# Altium PCB TYH-PD67W 2C1A 主板0722.pcbdoc (part 1 of 2)
Units mm, origin at the board's own origin, x right, y up, seen from the top; angles counter-clockwise.
Board outline 42.31 x 42.1 mm, 5 copper layers (Top Layer, Signal Layer 3, Signal Layer 1, Signal Layer 2, Bottom Layer), stack 0.941 mm thick; 52 components, 178 nets, 147 pads, 295 vias.
Unrouted connection lines stored in the file: 1.
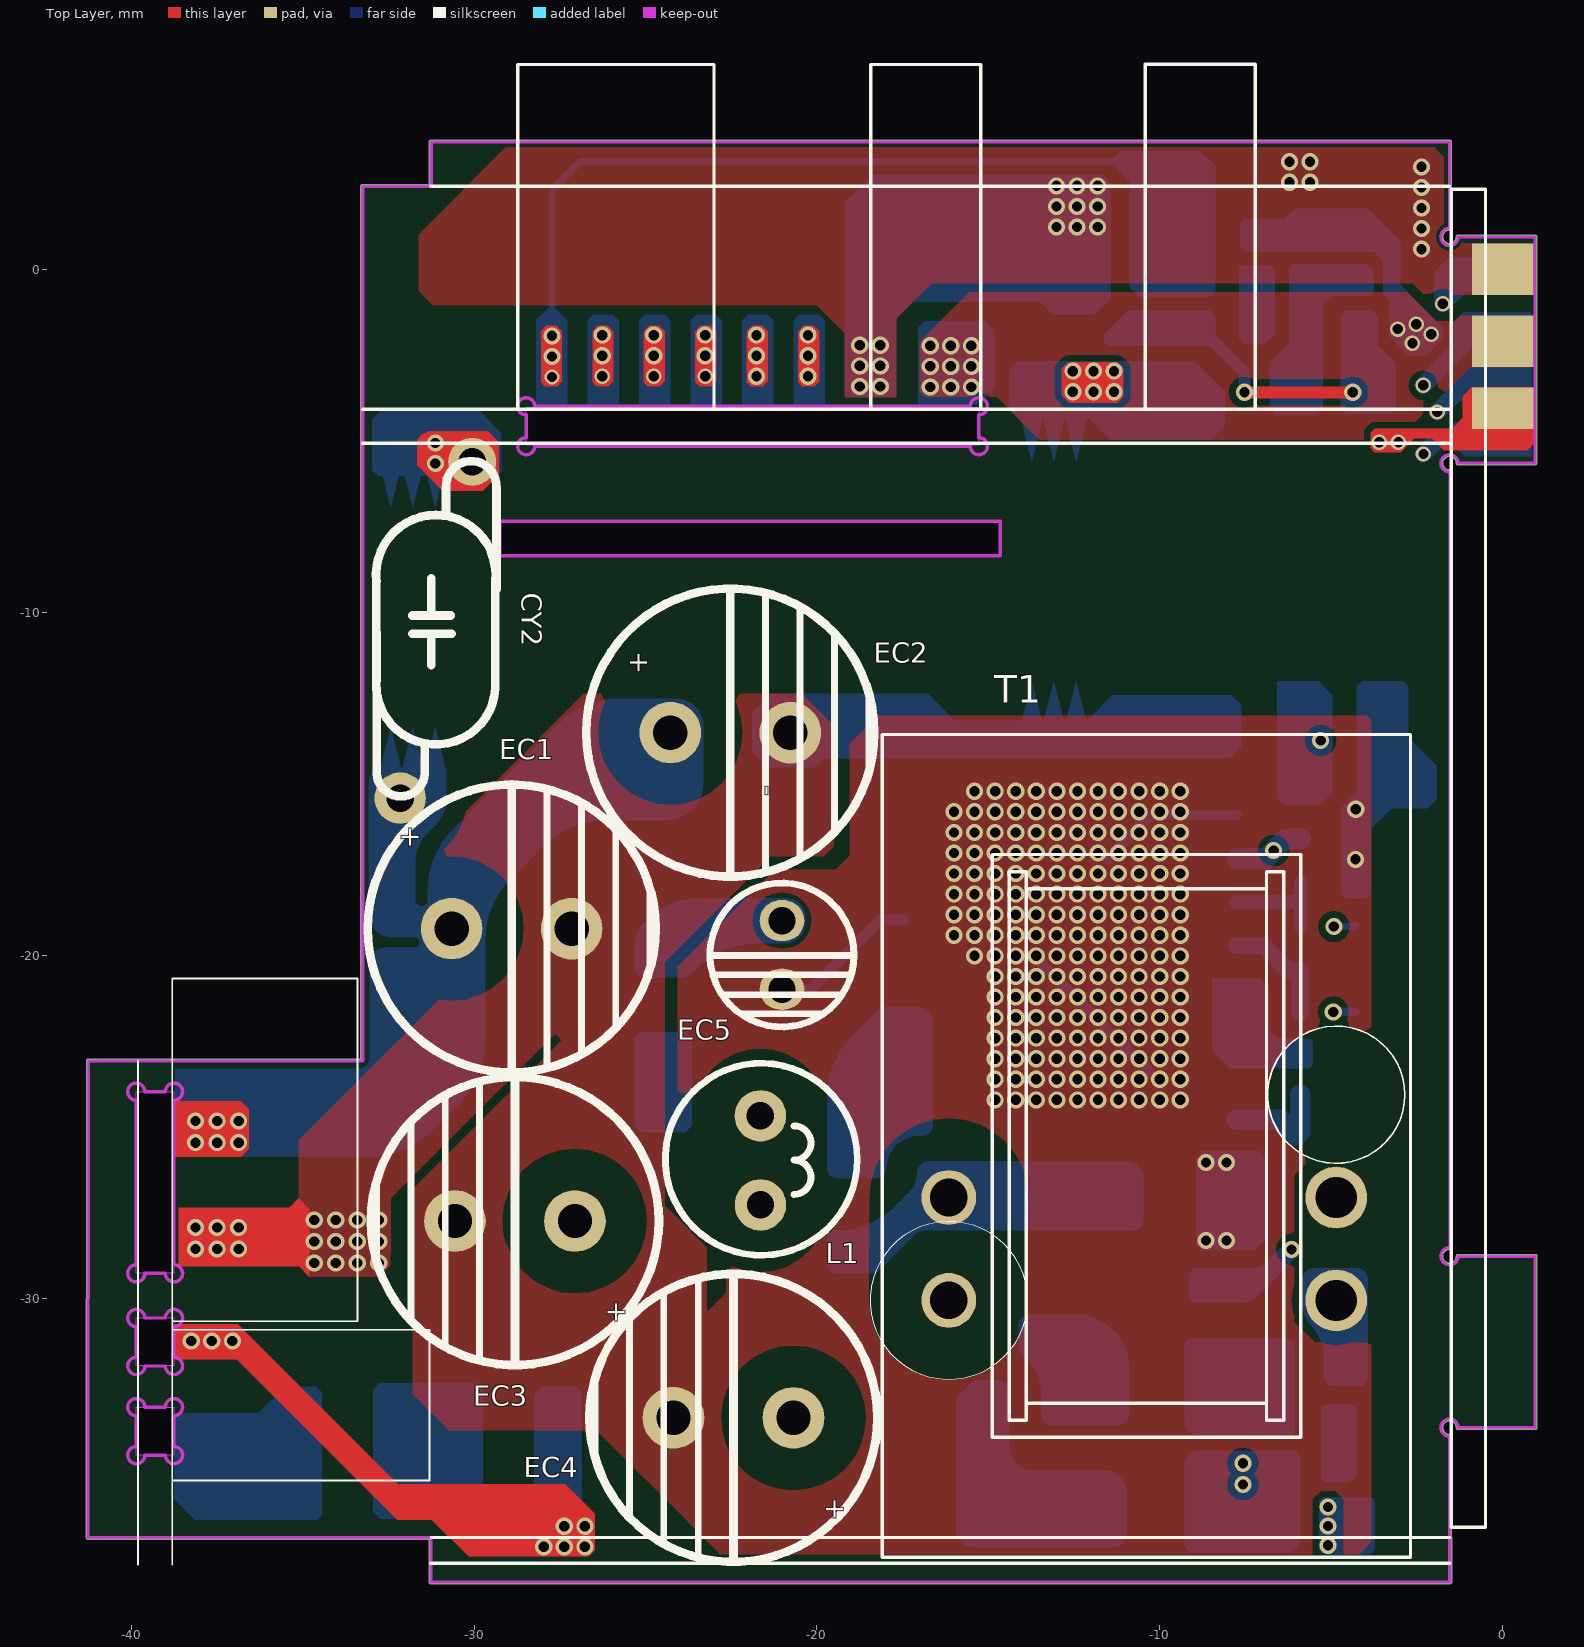
[diagram p0: Top Layer view]
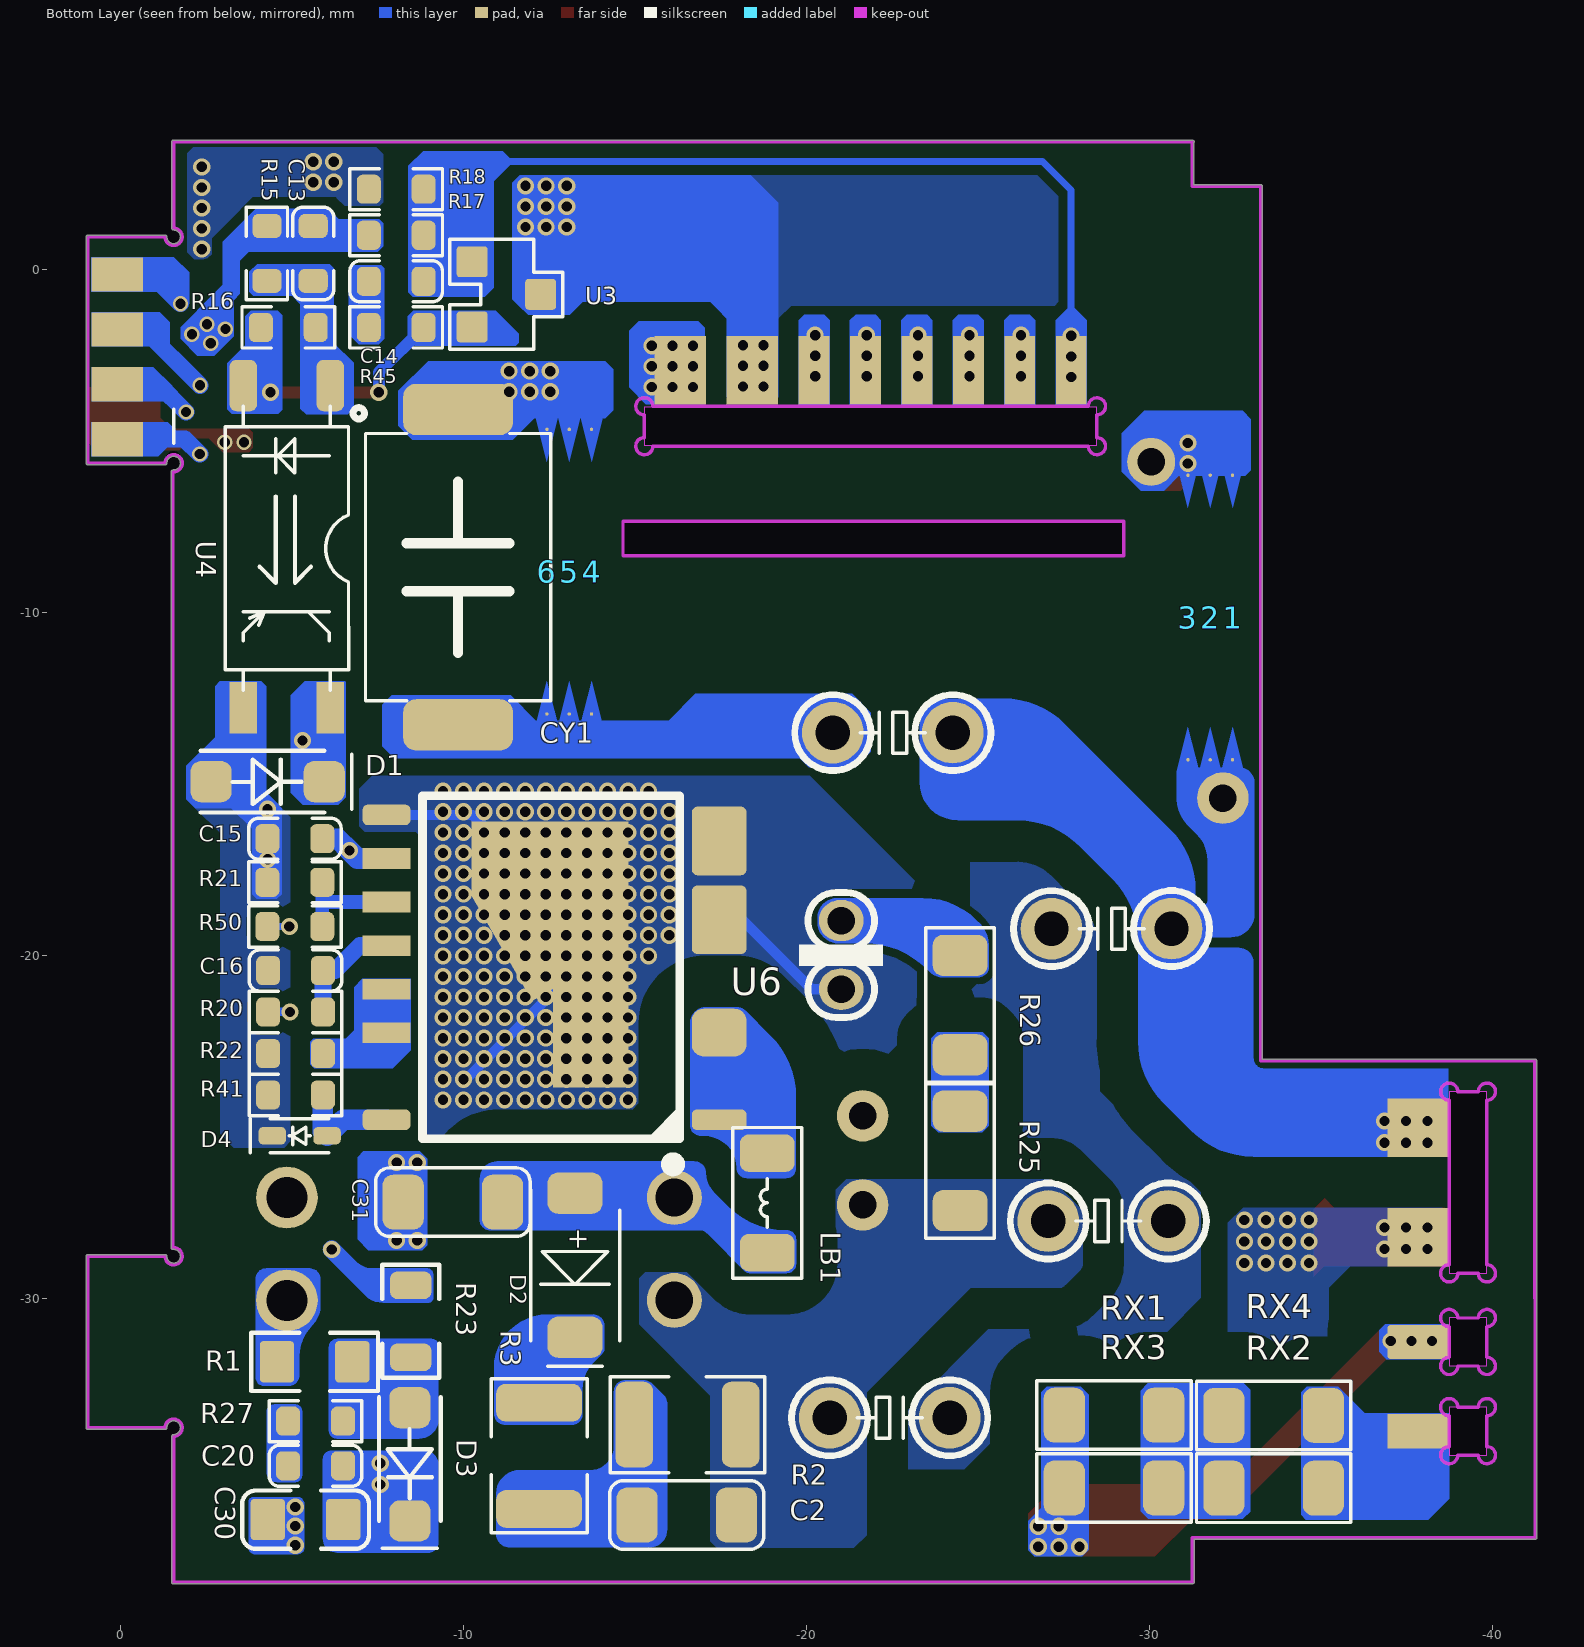
[diagram p1: Bottom Layer view, seen from below]
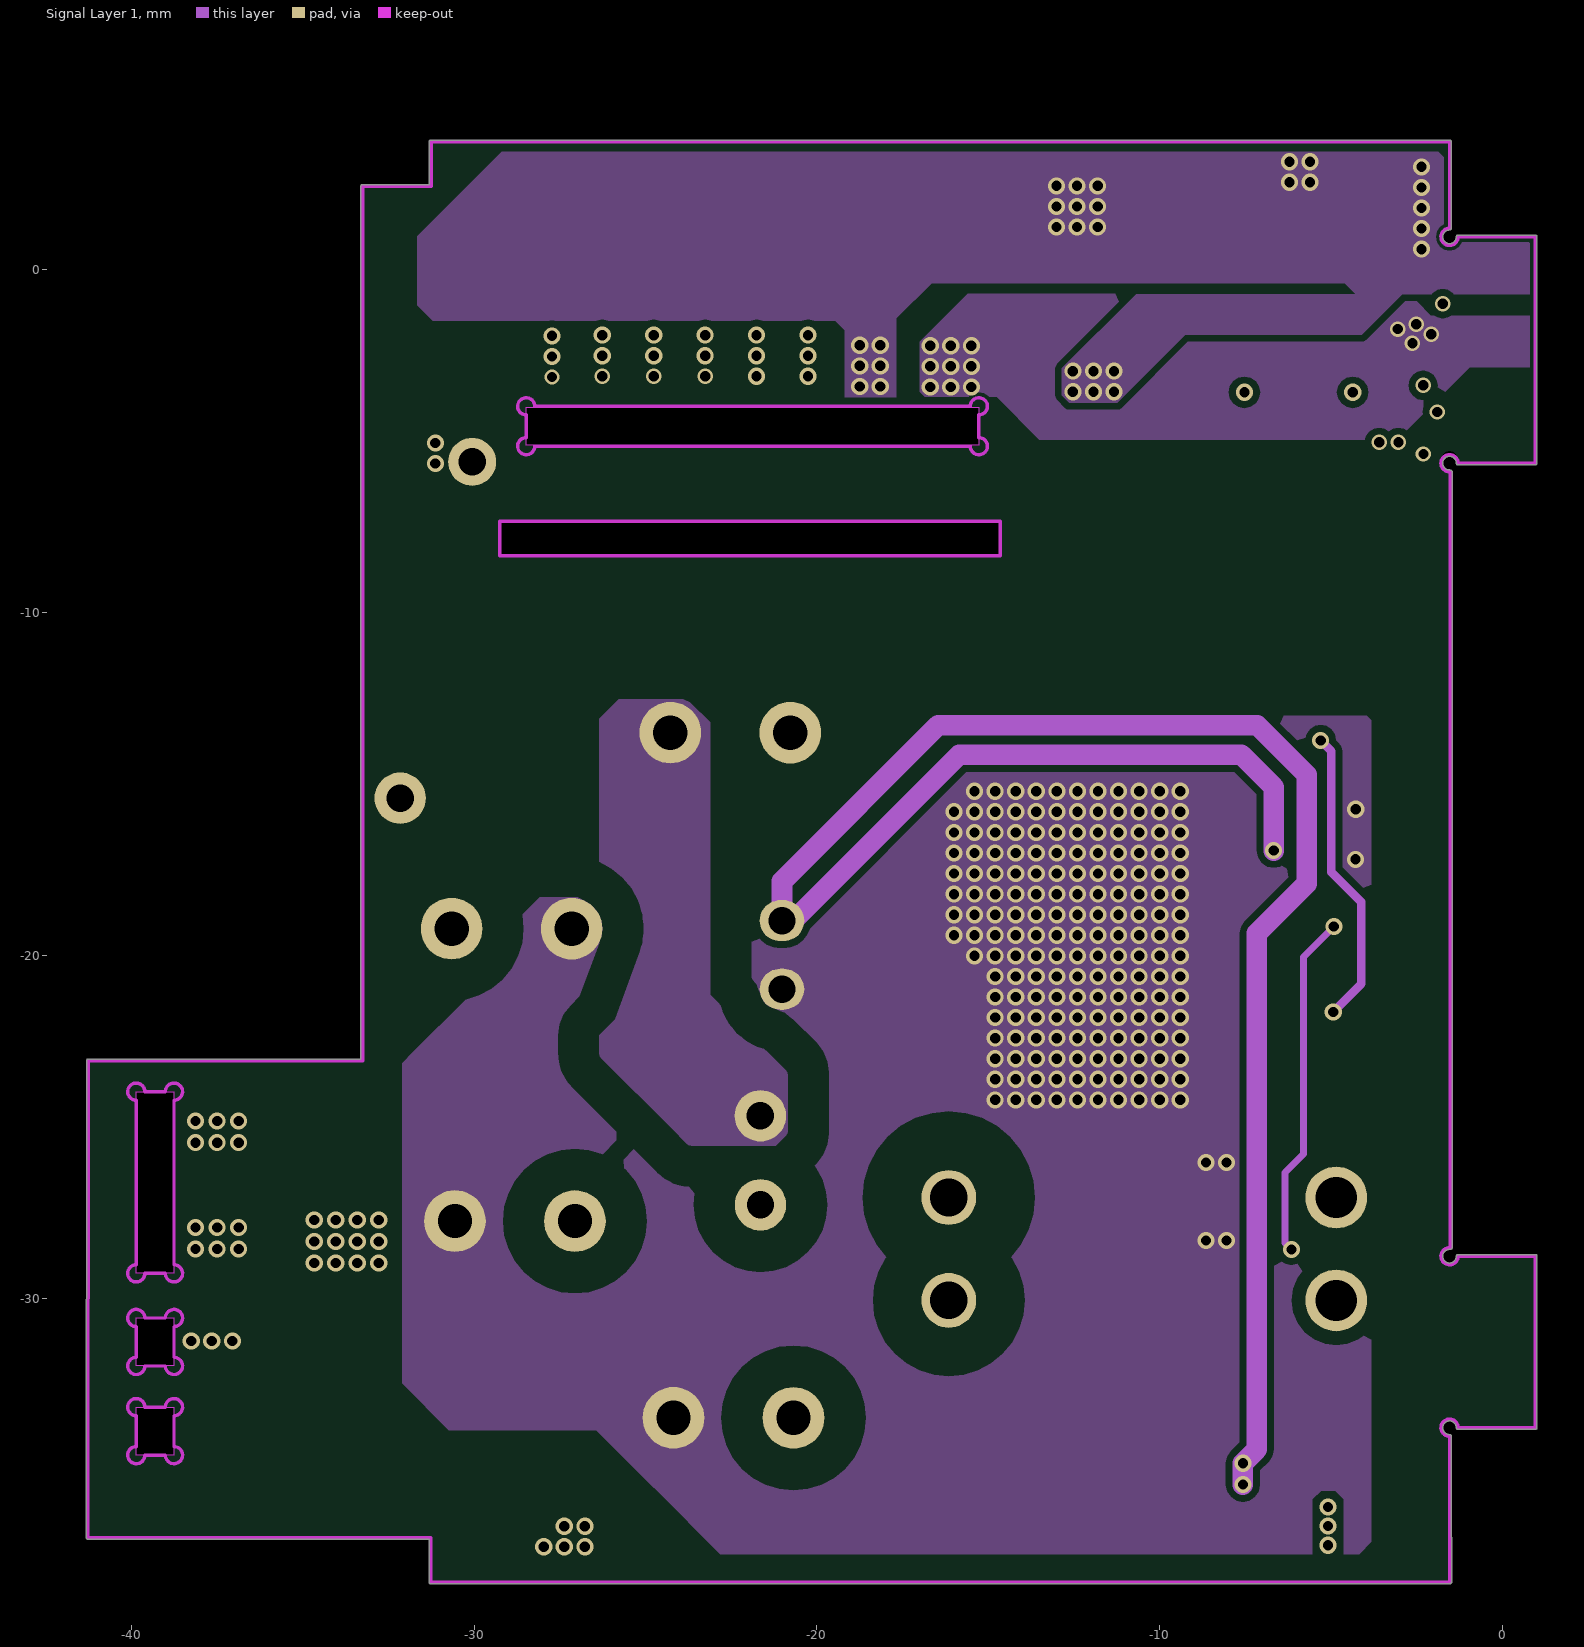
[diagram p2: Signal Layer 1]
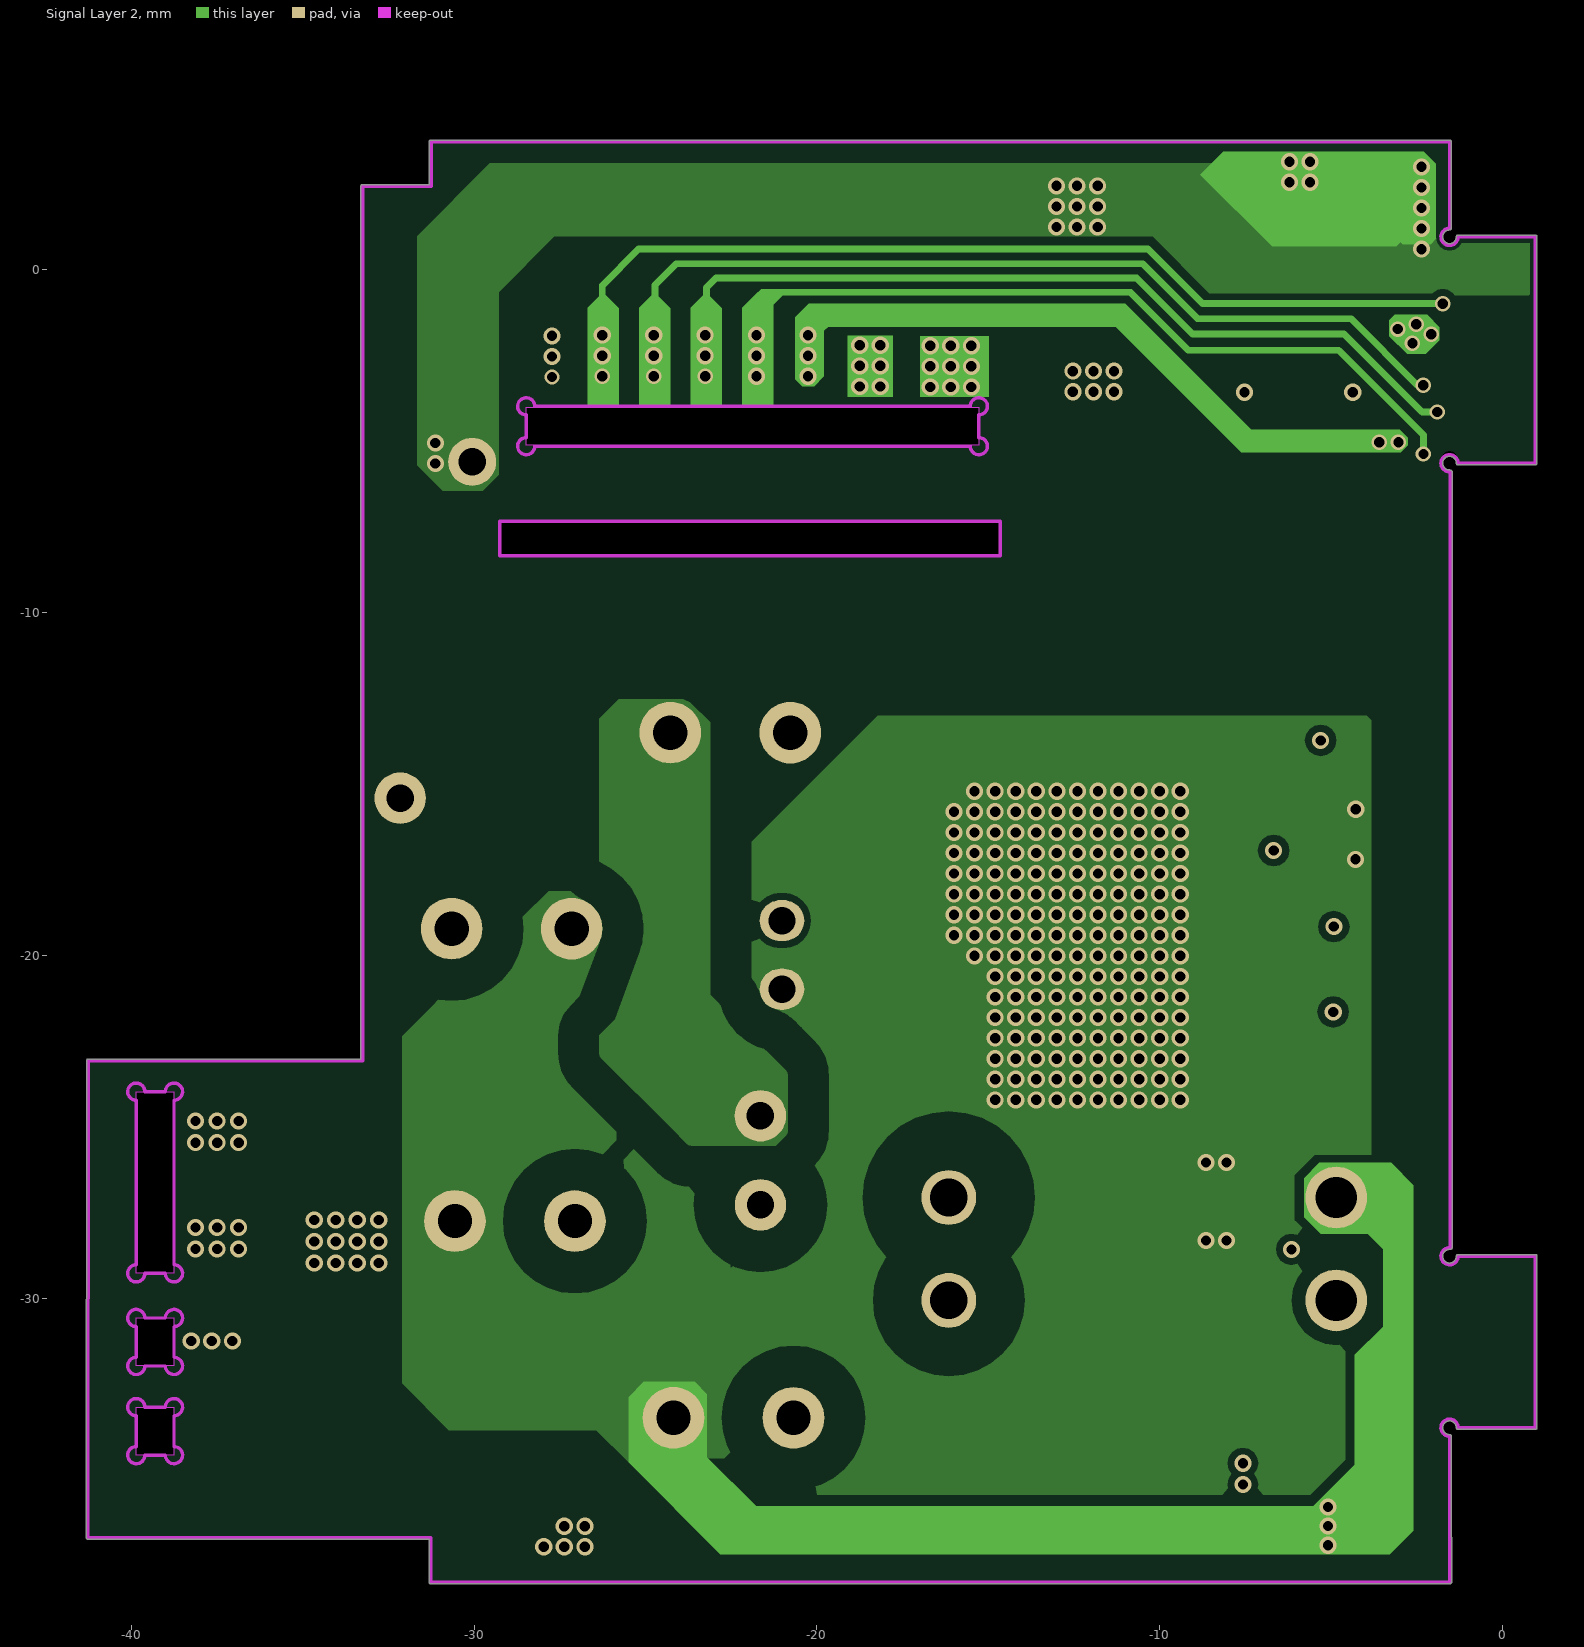
[diagram p3: Signal Layer 2]

## Layer stack, top to bottom
Top Solder: solder mask 0.0102, Solder Resist, Dk 3.5
Top Layer: signal copper 0.0356
Dielectric 1: core 0.254, FR-4, Dk 4.2
Signal Layer 3: signal copper 0.036
Dielectric 4: prepreg 0.127, Dk 4.2
Signal Layer 1: signal copper 0.036
Dielectric 2: core 0.254, Dk 4.2
Signal Layer 2: signal copper 0.036
Dielectric 3: prepreg 0.127, Dk 4.2
Bottom Layer: signal copper 0.0356
Bottom Solder: solder mask 0.0102, Solder Resist, Dk 3.5

## Board outline
-41.259,-37.031 -31.309,-37.033 -31.31,-38.283 ccw(c-31.26,-38.283) -31.26,-38.333 -1.55,-38.333 -1.54,-38.333 ccw(c-1.54,-38.283) -1.49,-38.283 ccw(c-1.54,-38.283) -1.49,-38.283 -1.491,-36.983 ccw(c-1.541,-36.983) -1.5,-36.954 -1.5,-34.031 ccw(c-1.55,-34.031) -1.55,-33.98 cw(c-1.55,-33.781) -1.35,-33.781 ccw(c-1.3,-33.781) -1.3,-33.831 0.95,-33.831 ccw(c0.95,-33.781) 1,-33.781 1,-28.781 ccw(c0.95,-28.781) 0.95,-28.73 -1.3,-28.73 ccw(c-1.3,-28.781) -1.35,-28.781 cw(c-1.55,-28.781) -1.55,-28.581 ccw(c-1.55,-28.531) -1.538,-28.579 ccw(c-1.526,-28.531) -1.475,-28.531 -1.475,-5.906 ccw(c-1.526,-5.906) -1.526,-5.856 ccw(c-1.55,-5.9) -1.55,-5.85 cw(c-1.55,-5.65) -1.35,-5.65 ccw(c-1.3,-5.65) -1.3,-5.7 0.95,-5.7 ccw(c0.95,-5.65) 1,-5.65 1,0.95 ccw(c0.95,0.95) 0.95,1 -1.3,1 ccw(c-1.3,0.95) -1.35,0.95 cw(c-1.55,0.95) -1.55,1.15 ccw(c-1.55,1.2) -1.5,1.2 -1.5,3.719 cw(c-1.55,3.719) -1.5,3.719 ccw(c-1.55,3.719) -1.55,3.77 ccw(c-1.55,3.719) -1.551,3.77 -31.25,3.77 cw(c-31.25,3.719) -31.249,3.77 -1.55,3.77 -31.26,3.77 ccw(c-31.26,3.719) -31.3,3.69 -31.3,2.47 -33.25,2.47 ccw(c-33.25,2.419) -33.3,2.419 -33.3,-23.03 -41.25,-23.03 ccw(c-41.25,-23.081) -41.3,-23.081 -41.31,-36.98 ccw(c-41.259,-36.98)
cut-out: -39.85,-33.181 -38.75,-33.181 -38.75,-34.581 -39.85,-34.581
cut-out: -39.85,-30.581 -38.75,-30.581 -38.75,-31.981 -39.85,-31.981
cut-out: -39.85,-23.981 -38.75,-23.981 -38.75,-29.281 -39.85,-29.281
cut-out: -14.654,-7.346 -29.254,-7.346 -29.254,-8.346 -14.654,-8.346
cut-out: -28.477,-4.024 -15.277,-4.024 -15.277,-5.124 -28.477,-5.124

## Design rules (kind name [scope] priority, off if disabled: settings)
Clearance Clearance_22 [InNet('HV') vs InNet('SW')] p1: gap=1.2
Clearance Clearance_21 [InNet('NetRX3_2') vs InNet('PGND')] p2: gap=1.5
Clearance Clearance_20 [InNet('NetBD1_1') vs InNet('PGND')] p3: gap=1.5
Clearance Clearance_19 [InNet('NetC4_2') vs InNet('PGND')] p4: gap=0.4
Clearance Clearance_18 [InNet('NetR15_1') vs InNet('PGND')] p5: gap=1
Clearance Clearance_17 [InNet('NetN_1') vs InNet('NetBD1_1')] p6: gap=1.55
Clearance Clearance_16 [InNet('NetN_1') vs InNet('PGND')] p7: gap=1.5
Clearance Clearance_15 [InNet('VIN') vs InNet('PGND')] p8 off: gap=5.8
Clearance Clearance_14 [InNet('CS') vs InNet('Bais-L')] p9: gap=0.45
Clearance Clearance_13 [InNet('SW') vs InNet('CS')] p10: gap=1.5
Clearance Clearance_12 [InNet('NetR15_1') vs InNet('CS')] p11: gap=1
Clearance Clearance_11 [InNet('NetBD1_3') vs InNet('CS')] p12: gap=1.1
Clearance Clearance_10 [InNet('HV') vs InNet('CS')] p13: gap=1.1
Clearance Clearance_9 [InNet('NetL2_1') vs InNet('CS')] p14: gap=1.5
Clearance Clearance_8 [InNet('NetC1_2') vs InNet('PGND')] p15: gap=1.2
Clearance Clearance_7 [InNet('NetBD1_3') vs InNet('PGND')] p16: gap=1.2
Clearance Clearance_6 [InNet('NetC2_2') vs InNet('PGND')] p17: gap=1.3
Clearance Clearance_5 [InNet('Bais-L') vs InNet('PGND')] p18: gap=0.45
Clearance Clearance_4 [InNet('SW') vs InNet('PGND')] p19: gap=1.5
Clearance Clearance_3 [InNet('HV') vs InNet('PGND')] p20: gap=1.2
Clearance Clearance_2 [InNet('NetL2_1') vs InNet('PGND')] p21: gap=1.5
Clearance Clearance_1 [OnLayer('Keep-Out Layer')] p22: gap=0.1
Clearance [All] p23: gap=0.2
PlaneConnect [All] p1: planeconnectstyle=Direct reliefexpansion=0.508 reliefentries=4 reliefconductorwidth=0.3 reliefairgap=0.254
PolygonConnect [All] p1: connectstyle=Direct reliefconductorwidth=0.3 reliefentries=4 polygonreliefangle="90 Angle" airgapwidth=0.3
RoutingVias [All] p1: holewidth=0.711 width=1.27 viastyle="Through Hole" minholewidth=0.711 minwidth=1.27 maxholewidth=0.711 maxwidth=1.27
SolderMaskExpansion [All] p1: expansion=0.05
Width [All] p1: maxlimit=10 minlimit=0.1 preferedwidth=0.2
28 further rules are at their usual default settings.

## Components (designator, comment, footprint, x,y, rotation, side; value= is the part's Value field where it differs from the comment)
1 "Comment" PET -32.431,-14.302 r180 top
2 "Comment" PET -31.781,-14.302 r180 top
3 "Comment" PET -31.131,-14.302 r180 top
4 "Comment" PET -13.737,-12.966 r180 top
5 "Comment" PET -13.087,-12.966 r180 top
6 "Comment" PET -12.437,-12.966 r180 top
C2 "1nF/1KV/1206" 1206CA -17.965,-36.325 r0 bottom (schematic designator C1)
C13 "33nF/25V/0402" 0603CX#1 -5.62,0.465 r90 bottom (schematic designator C21)
C14 "0.1uF" 0603CX#2 -8.839,-0.349 r0 bottom
C15 "2.2uF/25V/0603" 0603CX#2 -5.885,-16.602 r0 bottom (schematic designator C7)
C16 "470pF/25V/0402" 0603CX#1 -5.104,-20.448 r0 bottom (schematic designator C5)
C20 "220PF/250V/0805" 0603CX#2 -4.889,-34.894 r180 bottom (schematic designator C4)
C30 "1nF/1KV/1206" 0805C -7.247,-37.311 r0 bottom (schematic designator C1)
C31 "47PF/1KV/1206" 1206CA -11.145,-27.203 r0 bottom (schematic designator C2)
CY1 "470pF/400V" Y1-SMT -9.844,-8.685 r270 bottom (schematic designator CY2)
CY2 "470pF/400V" Y1-N -32.151,-15.419 r270 top
D1 "ER07J/SOD-123" SOD-123A -5.942,-14.941 r0 bottom (schematic designator D3)
D2 "S2M" SMAF -13.257,-29.042 r270 bottom (schematic designator D1)
D3 "ER07J/SOD-123" SOD-123A -8.439,-36.498 r90 bottom
D4 "ER07J/SOD-123" SOD-523 -6.024,-25.266 r0 bottom (schematic designator D3)
EC1 "33uF/400V/10*20max" EC-8*18L -28.904,-19.225 r90 top (schematic designator EC3)
EC2 "33uF/400V/10*20max" EC-8*18L -22.525,-13.51 r90 top (schematic designator EC1)
EC3 "33uF/400V/10*20max" EC-8*18L -28.806,-27.755 r270 top
EC4 "33uF/400V/10*20max" EC-8*18L -22.431,-33.494 r270 top (schematic designator EC3)
EC5 "4.7uF/100V/5*11" EC-4*7L -21.018,-18.993 r0 top (schematic designator C6)
L1 "LGB0510  80uH" L-5*11 -21.645,-24.885 r270 top
LB1 "600R@100MHZ" 1206L -18.862,-25.775 r270 bottom (schematic designator L2)
R1 "2.2R/0805" 0805R -4.496,-31.858 r180 bottom (schematic designator R13)
R2 "300K/1206" 1210RS -18.085,-33.689 r0 bottom (schematic designator R1)
R3 "10R/0805" 1210RS -12.207,-36.15 r90 bottom (schematic designator R4)
R15 "1K/0402" 0603RX#1 -4.269,0.465 r270 bottom (schematic designator R22)
R16 "1M/0402" 0603RX#1 -4.893,-1.693 r0 bottom (schematic designator R21)
R17 "100K" 0603RX#1 -8.04,0.996 r180 bottom
R18 "95.3K" 0603RX#1 -8.04,2.341 r180 bottom
R20 "51R/0402" 0603RX#1 -5.104,-21.655 r0 bottom (schematic designator R9)
R21 "18K/0402" 0603RX#1 -5.085,-17.876 r0 bottom (schematic designator R14)
R22 "220K/0805" 0603RX#2 -4.304,-22.869 r180 bottom (schematic designator R7)
R23 "220K/0805" 0805RX -8.465,-29.628 r270 bottom (schematic designator R7)
R25 "10K/1206" 1206RA -23.486,-28.201 r90 bottom (schematic designator R15)
R26 "10K/1206" 1206RA -23.486,-23.655 r90 bottom (schematic designator R15)
R27 "10R/0805" 0603RX#2 -6.488,-33.589 r0 bottom (schematic designator R10)
R41 "51R/0402" 0603RX#1 -5.104,-24.077 r180 bottom (schematic designator R9)
R45 "95.3K" 0603RX#1 -8.04,-1.693 r180 bottom
R50 "18K/0402" 0603RX#1 -5.085,-19.166 r0 bottom (schematic designator R14)
RX1 "2M 1206" 1206RA -31.174,-34.415 r0 bottom
RX2 "2M 1206" 1206RA -35.83,-36.545 r0 bottom
RX3 "2M 1206" 1206RA -31.174,-36.539 r0 bottom
RX4 "2M 1206" 1206RA -35.83,-34.42 r0 bottom
T1 "Comment" "ATQ2315P 4+4" -16.153,-21.068 r0 top
U3 "2N7002KL SOT-23" SOT-23_R -11.254,-0.727 r270 bottom (schematic designator Q8)
U4 "LTV-217-B" CT1018 -6.521,-2.637 r270 bottom
U6 "Comment" MK2789IAM/ESOP10(分) -16.31,-15.355 r180 bottom

## Footprints (in the part's own frame and the unit in brackets; to place one, negate y for a bottom-side part, rotate by r counter-clockwise, add the part's x,y. Pads: shape width x height; smd on the part's side, far side on the other; paste and mask are expansions set on the pad)
0603CX#1 [mm]
  rrect50% 0.7x0.85 smd: 1(-0.8,0) 2(0.8,0)
  silkscreen extent -1.35,-0.6 1.35,0.6, body extent -0.8,-0.41 0.8,0.41, height 0.81
0603CX#2 [mm]
  rrect50% 0.7x0.85 smd: 1(0,0) 2(1.6,0)
  silkscreen extent -0.55,-0.6 2.15,0.6, body extent 0,-0.41 1.6,0.41, height 0.81
0603RX#1 [mm]
  rrect50% 0.7x0.85 smd: 1(-0.8,0) 2(0.8,0)
  silkscreen extent -1.35,-0.6 1.35,0.6, body extent -0.77,-0.42 0.78,0.43, height 0.45
0603RX#2 [mm]
  rrect50% 0.7x0.85 smd: 1(0,0) 2(1.6,0)
  silkscreen extent -0.55,-0.6 2.15,0.6, body extent 0.03,-0.42 1.58,0.43, height 0.45
0805C [mm]
  rrect20% 1x1.2 smd: 1(0.75,-0.85) 2(2.95,-0.85)
  silkscreen extent 0,-1.7 3.7,0, body extent 0.85,-1.46 2.85,-0.24, height 0.51
0805R [mm]
  rrect20% 1x1.2 smd: 1(0.066,-0.001) 2(2.266,-0.001)
  silkscreen extent -0.68,-0.85 3.02,0.85, body extent 0.17,-0.63 2.17,0.62, height 0.45
0805RX [mm]
  rrect50% 0.8x1.2 smd: 1(0,0) 2(2.1,0)
  silkscreen extent -0.6,-0.83 2.7,0.83, body extent 0.05,-0.61 2.05,0.61, height 0.51
1206CA [mm]
  rrect50% 1.2x1.6 smd mask+0.03: 1(0,0) 2(2.9,0)
  silkscreen extent -0.8,-1 3.7,1, body extent -0.15,-0.81 3.05,0.81, height 1.21
1206L [mm]
  rrect50% 1.1x1.6 smd mask+0.03: 1(0,0) 2(2.9,0)
  silkscreen extent -0.75,-1 3.65,1, body extent -0.15,-0.8 3.05,0.8, height 1
1206RA [mm]
  rrect50% 1.2x1.6 smd mask+0.03: 1(3.65,-1) 2(0.75,-1)
  silkscreen extent -0.05,-2 4.45,0, body extent 0.6,-1.8 3.8,-0.2, height 0.55
1210RS [mm]
  rrect50% 1.1x2.5 smd mask+0.03: 1(3.1,0) 2(0,0)
  silkscreen extent -0.7,-1.4 3.8,1.4, body extent -0.05,-1.25 3.15,1.25, height 0.55
"ATQ2315P 4+4" [mm]
  round 1 on Top Overlay mask+0.04: 1(0,0) 2(0,-3) 7(11.3,-3) 8(11.3,0)
  round 1.6 hole 1.1 mask+0.04: 3(0,-6) 4(0,-9)
  round 1.8 hole 1.2 mask+0.04: 5(11.3,-9) 6(11.3,-6)
  silkscreen extent -1.94,-16.5 13.46,7.5, body extent -1.79,-16.02 13.31,7.08, height 19.06
CT1018 [mm]
  rrect50% 1.5x0.8 smd: 1(0.75,-0.4) 2(0.75,-2.94)
  rect 1.5x0.8 smd: 3(10.15,-2.941) 4(10.15,-0.4)
  silkscreen extent 1.36,-3.47 9.64,0.59, body extent 0.38,-3.47 10.58,0.13, height 2.3
EC-4*7L [mm]
  oval 1.3x1.2 hole 0.8: 1(0,0) 2(0,-2)
  silkscreen extent -2.1,-3.1 2.1,1.1, body extent -2.01,-3.04 1.99,0.98, height 8.04
EC-8*18L [mm]
  round 1.8 hole 1: 1(0,1.749) 2(-0.002,-1.751)
  silkscreen extent -4.2,-4.2 4.2,4.2, body extent -4,-4 4,4, height 18
L-5*11 [mm]
  round 1.5 hole 0.8: 1(-0.2,0) 2(2.4,0)
  silkscreen extent -1.73,-2.77 3.87,2.82, body extent -1.56,-2.61 3.71,2.64, height 11.5
MK2789IAM/ESOP10(分) [mm]
  rrect50% 1.6x0.6 smd: 1(1.15,-9.445)
  rrect50% 1.6x1.4 smd: 2(1.15,-6.905)
  rrect20% 1.6x2 smd: 3(1.15,-3.615) 4(1.15,-1.315)
  rrect50% 1.4x0.6 smd: 5(-8.55,-0.555) 11(-8.55,-9.445)
  rect 1.4x0.6 smd: 7(-8.55,-3.095) 8(-8.55,-4.365) 9(-8.55,-5.635) 10(-8.55,-6.905) EM(-8.55,-1.825)
  rect 2.6x2.165 smd: 12(-4.775,-1.833)
  rect 3.55x2.6 smd rot 120: 12(-4.062,-3.802)
  rect 2.2x7.755 smd: 12(-2.6,-4.627)
  silkscreen extent -7.5,-10.89 0.05,0, body extent -8.91,-10 1.41,0, height 1.85
PET [mm]
  round 0.1 smd far side: 1(0,0) 2(0,-8.3)
  Bottom Layer region: 0.35,-8.75 -0.35,-8.75 0,-7.35
  Bottom Layer region: 0.325,0.35 -0.325,0.35 0,-0.95
SMAF [mm]
  rrect50% 1.2x1.6 smd: 1(-2.1,0) 2(2.1,0)
  silkscreen extent -2.2,-1.3 2.95,1.3, body extent -2.35,-1.25 2.35,1.25, height 1
SOD-123A [mm]
  rrect50% 1.2x1.2 smd: 1(3.3,0) 2(0,0)
  silkscreen extent -0.8,-0.9 3.6,0.9, body extent -0.19,-0.8 3.51,0.8, height 1.22
SOD-523 [mm]
  rrect50% 0.8x0.5 smd: 1(0,0) 2(1.6,0)
  silkscreen extent -0.05,-0.5 2.24,0.5, body extent 0,-0.4 1.6,0.4, height 0.65
SOT-23_R [mm]
  rrect20% 0.9x0.9 smd: 1(-0.95,-1) 2(0.95,-1) 3(0,1)
  silkscreen extent -1.6,-1.65 1.6,1.65, body extent -1.46,-1.44 1.44,1.36, height 1.2
Y1-N [mm]
  round 1.5 hole 0.8: 1(0,0)
  round 1.4 hole 0.8: 2(-9.806,2.096)
  silkscreen extent -9.83,-0.7 -0.05,2.8, body extent -10.14,-1.57 0.34,3.66, height 8.2
Y1-SMT [mm]
  rrect50% 1.5x3.2 smd: 1(-4.6,0) 2(4.6,0)
  silkscreen extent -3.9,-2.7 3.9,2.7, body extent -5,-2.7 5,2.7, height 2.5

## Part data
C2 C15 C16 C20 C30 C31: library part CAP
C13: library part Cap, "Capacitor"
CY1 CY2: library part Cap
D1 D3 D4: library part DIODE
D2: library part Diode_fast, "High Conductance Fast Diode"
EC1 EC2 EC3 EC4 EC5: library part CAPACITOR, "C?"
L1: library part L-1
LB1 R1 R2 R3 R15 R16 R20 R21 R22 R23 R25 R26 R27 R41 R50 RX1 RX2 RX3 RX4: library part Res1, "Resistor"
U3: library part NMOS
U4: library part PC817, "Optocoupler，PC817X2YIPW，4pin SOP"

## Free pads (board coordinates)
  rect 1.8x1 smd far side: 0(-37.85,-33.881)
  rrect20% 1.8x1 smd far side: 0(-37.85,-31.281)
  rect 1.8x1.7 smd far side: 0(-37.85,-28.231) 0(-37.85,-25.031)
  rect 1.5x2 smd far side: 0(-18.427,-2.943) 1(-16.327,-2.943)
  round 0.2 hole 0.5: 0(-1.55,-5.55) 2(-1.55,-28.781) 3(-1.55,-33.781)
  rect 0.9x2 smd far side: 2(-27.727,-2.943) 2(-26.227,-2.943) 2(-24.727,-2.943) 2(-23.227,-2.943) 2(-21.727,-2.943) 2(-20.227,-2.943)
  rect 1.8x1.2 smd: 3(0,-4.05)
  rect 1.8x1.5 smd: 3(0,-2.1) 3(0,0)
  rect 1.5x1 smd far side: 3(0.1,-4.95) 3(0.1,-3.35) 3(0.1,-1.75) 3(0.1,-0.15)

## Via types
v1: diameter 0.5, hole 0.3, Top Layer to Bottom Layer, tented both sides, 281 vias
v2: diameter 0.45, hole 0.3, Top Layer to Bottom Layer, tented both sides, 14 vias

## Nets (pads, with @x,y where several pads share a name; then routed paths per layer and width w, separated by ;. In a path a pad name is that pad's centre, name@x,y a point inside that pad or via, vN(x,y) a via of type N, cw(c..) or ccw(c..) an arc to the next point about the centre after c; other vN are vias at no path point)
3.3V: 
A: C14.2 R45.1
A+: 
A-: 
BACK_LED: 
Bais-L: D3.1 R1.2 R23.2 R27.1
BOOT0: 
BUTTON: 
CC1: 
CC2: 
CPA: 
CS: 
D: 
D25_INT: 
D31_EN1: 
D31_EN2: 
D31_INT1: 
D+: 
D-: 
DM: 
DP: 
EM: D4.1 R41.2 U6.11 | length 3.2
  Bottom Layer w0.6: U6.11@-7.76,-24.8 -6.491,-24.8 D4.1@-6.024,-25.266 -5.904,-25.147 R41.2@-5.904,-24.077
EN: 
EN_IC: 
FB: C16.1 R20.1 U6.8 | length 3.4
  Bottom Layer w0.5: U6.8@-7.76,-19.72 -6.981,-19.72 -6.253,-20.447 C16.1@-5.904,-20.447 R20.1@-5.904,-21.655
FLASH_CLK: 
FLASH_CS: 
FLASH_MISO: 
FLASH_MOSI: 
G-SR: 
GND-C: 
HV: C2.1 EC3.1 EC4.1 L1.2 R2.2 R25.2 T1.4
ISET: R22.2 U6.9 U6.10 | length 3.4
  Bottom Layer w0.5: U6.9@-7.76,-20.99 U6.10@-7.76,-22.26 -7.151,-22.869 R22.2@-5.904,-22.869
KEY: 
KEY1: 
LCD_CS: 
LCD_DC: 
LCD_EN2: 
LCD_MOSI: 
LCD_RES: 
LCD_TE: 
LEDA: 
M: R23.1 R50.2 | length 13.4
  Signal Layer 1 w0.2: v1(-6.161,-28.581) -6.352,-28.39 -6.352,-26.343 -5.808,-25.799 -5.808,-20.05 v1(-4.923,-19.166)
  Bottom Layer w0.2: R23.1@-8.465,-29.628 -7.209,-29.628 v1(-6.161,-28.581) ; v1@-4.909,-19.166 R50.2@-4.285,-19.166
N: 
NetBD1_1: pad.0@-37.85,-31.281 RX1.1 RX3.1
  other v1: -27.966,-37.254 -27.366,-37.254 -26.766,-37.254 -27.366,-36.654 -26.766,-36.654 -38.248,-31.254 -37.648,-31.254 -37.048,-31.254
NetBD1_3: 1.1 2.1 3.1 CY2.1 EC1.1 EC2.1 L1.1 pad.0@-37.85,-25.031 | length 20.4
  Bottom Layer w0.2: pad.0@-37.85,-25.031 -34.557,-25.031 ccw(c-34.557,-22.491) -32.761,-24.287 -31.397,-22.922 ccw(c-33.193,-21.126) -30.653,-21.126 EC1.1@-30.653,-19.225 -30.653,-19.018 cw(c-28.113,-19.018) -29.909,-17.222 -26.941,-14.254 cw(c-25.145,-16.05) -25.145,-13.51 EC2.1@-24.274,-13.51
  other v1: -38.12,-25.466 -37.492,-25.466 -36.864,-25.466 -38.12,-24.839 -37.492,-24.839 -36.864,-24.839
NetBD2_1: 
NetC1_1: 
NetC1_2: C2.2 R2.1 R3.2
NetC2_2: D2.2 R3.1
NetC3_2: 
NetC4_1: C20.1 R27.2
NetC4_2: R1.1 T1.5
NetC5_2: 
NetC6_1: C15.1 C20.2 C30.1 D3.2 EC5.1 R26.1 U6.EM | length 65.3
  Signal Layer 1 w0.6: v1(-7.575,-35.439) v1(-7.575,-34.818) -7.172,-34.415 -7.172,-19.367 -5.715,-17.909 -5.715,-14.739 -7.155,-13.298 -16.467,-13.298 -21.018,-17.849 EC5.1@-21.018,-18.993 -20.688,-18.993 -15.852,-14.158 -7.619,-14.158 -6.679,-15.098 v1(-6.679,-16.947)
  Bottom Layer w0.6: R26.1@-24.486,-20.005 R26.1@-24.213,-19.731 ; R26.1@-24.432,-20.062 -23.362,-18.993 EC5.1@-21.018,-18.993 ; U6.EM@-7.76,-17.18 -6.912,-17.18 v1(-6.679,-16.947) -6.334,-16.602 C15.1@-5.885,-16.602
NetC10_2: 
NetC21_1: C13.1 R15.2 R16.1 U4.1
NetC22_1: 
NetC24_1: 
NetC25_2: 
NetC26_2: 
NetC30_2: 
NetC31_2: 
NetC100_2: 
NetC101_1: 
NetC101_2: 
NetC112_1: 
NetD4_K: D1.2 R20.2 U4.4 | length 11.9
  Signal Layer 1 w0.25: v1(-5.308,-13.737) -4.997,-14.048 -4.997,-17.577 -4.125,-18.449 -4.125,-20.837 v1(-4.943,-21.655)
  Bottom Layer w0.25: D1.2@-5.942,-14.941 D1.2@-5.832,-15.051 ; D1.2@-5.91,-15.129 -5.649,-14.867 -5.649,-12.832 ; v1(-4.943,-21.655) R20.2@-4.304,-21.655
NetF1_1: 
NetF1_2: 
NetKEY1_1: 
NetL2_1: LB1.1 U6.1 U6.2
NetLF1_2: 
NetN_1: pad.0@-37.85,-33.881 RX2.2 RX4.2
NetNTC2_1: 
NetQ1_3: 
NetQ3_4: 
NetQ3_G: 
NetR3_1: 
NetR4_1: 
NetR15_1: R25.1 R26.2
NetR25_2: 
NetR29_1: 
NetR31_2: 
NetR32_2: 
NetR41_2: 
NetR42_2: 
NetR134_1: 
NetRX1_2: 
NetRX3_2: RX1.2 RX2.1 RX3.2 RX4.1
NetU1_26: 
NetU1_27: 
NetU1_28: 
NetU1_29: 
NetU1_30: 
NetU1_32: 
NewNet1: 
NewNet2: 
NewNet3: 
NewNet4: 
NewNet5: 
NewNet6: 
NewNet7: 
NewNet8: 
NewNet9: 
NewNet10: 
NewNet11: 
NewNet12: 
NewNet13: 
NewNet14: 
NewNet15: 
NewNet16: 
NewNet18: 
NewNet22: 
NewNet23: 
NewNet24: 
NewNet25: 
NewNet28: 
NewNet32: 
NewNet33: C14.1 pad.2@-27.727,-2.943 R17.2 R18.2 U3.1 | length 29.9
  Bottom Layer w0.2: pad.2@-27.719,-3.695 -27.719,2.318 -26.894,3.142 -9.642,3.142 R18.2@-8.84,2.34 C14.1@-8.84,-0.348 -9.682,-0.348 U3.1@-10.254,0.223
  other v1: -27.725,-2.537 -27.725,-1.937
  other v2: -27.725,-3.137
NewNet34: 
NewNet36: 
NewNet38: 
NewNet40: 
NewNet41: 
NewNet42: 
OPTO: R16.2 R45.2 U3.2 U4.2 | length 5.6
  Top Layer w0.35: v1(-7.532,-3.584) v1(-4.374,-3.584)
  Bottom Layer w0.35: R45.2@-8.84,-1.693 -7.532,-3 v1(-7.532,-3.584)
OTP: 
PA2: 
PA4: 
PA5: 
PA6: 
PA7: 
PA8: 
PA9: 
PB0: 
PB1: 
PB7: 
PF0: 
PF1: 
PF3: 
PGND: 4.1 5.1 6.1 C15.2 C16.2 C30.2 C31.2 CY1.2 D1.1 D4.2 EC1.2 EC2.2 EC3.2 EC4.2 EC5.2 pad.0@-37.85,-28.231 R21.2 R22.1 R41.1 T1.6 U4.3 U6.3 U6.4 U6.5 U6.12 | length 32.9
  Signal Layer 2 w0.3: v1(-5.096,-37.208) -4.321,-37.208 -3.001,-35.888 -3.001,-27.906 -3.84,-27.068 T1.6@-4.853,-27.068
  Bottom Layer w0.3: EC5.2@-21.018,-20.993 -20.159,-20.993 -18.135,-18.969 U6.3@-17.46,-18.969 ; U6.12@-13.71,-19.982 v1@-10.192,-23.5 ; U6.12@-11.535,-17.187 -10.257,-15.91 U6.5@-7.76,-15.91 ; R21.2@-4.285,-17.876 v1(-4.285,-15.746) -3.48,-14.941 D1.1@-2.642,-14.941 -3.109,-14.474 -3.109,-12.832
  other v1: -5.096,-36.645 -5.096,-36.091 -34.66,-28.979 -34.033,-28.979 -33.405,-28.979 -32.777,-28.979 -38.12,-28.568 -37.492,-28.568 -36.864,-28.568 -34.66,-28.351 -34.033,-28.351 -33.405,-28.351 -32.777,-28.351 -8.654,-28.319 -8.054,-28.319 -38.12,-27.94 -37.492,-27.94 -36.864,-27.94 -34.66,-27.723 -34.033,-27.723 -33.405,-27.723 -32.777,-27.723 -8.654,-26.046 -8.054,-26.046 -14.802,-24.219 -14.202,-24.219 -13.602,-24.219 -13.002,-24.219 -12.402,-24.219 -11.802,-24.219 -11.202,-24.219 -10.602,-24.219 -10.002,-24.219 -9.402,-24.219 -14.802,-23.619 -14.202,-23.619 -13.602,-23.619 -13.002,-23.619 -12.402,-23.619 -11.802,-23.619 -11.202,-23.619 -10.602,-23.619 -10.002,-23.619 -9.402,-23.619 -14.802,-23.019 -14.202,-23.019 -13.602,-23.019 -13.002,-23.019 -12.402,-23.019 -11.802,-23.019 -11.202,-23.019 -10.602,-23.019 -10.002,-23.019 -9.402,-23.019 -14.802,-22.419 -14.202,-22.419 -13.602,-22.419 -13.002,-22.419 -12.402,-22.419 -11.802,-22.419 -11.202,-22.419 -10.602,-22.419 -10.002,-22.419 -9.402,-22.419 -14.802,-21.819 -14.202,-21.819 -13.602,-21.819 -13.002,-21.819 -12.402,-21.819 -11.802,-21.819 -11.202,-21.819 -10.602,-21.819 -10.002,-21.819 -9.402,-21.819 -14.802,-21.219 -14.202,-21.219 -13.602,-21.219 -13.002,-21.219 -12.402,-21.219 -11.802,-21.219 -11.202,-21.219 -10.602,-21.219 -10.002,-21.219 -9.402,-21.219 -14.802,-20.619 -14.202,-20.619 -13.602,-20.619 -13.002,-20.619 -12.402,-20.619 -11.802,-20.619 -11.202,-20.619 -10.602,-20.619 -10.002,-20.619 -9.402,-20.619 -15.402,-20.019 -14.802,-20.019 -14.202,-20.019 -13.602,-20.019 -13.002,-20.019 -12.402,-20.019 -11.802,-20.019 -11.202,-20.019 -10.602,-20.019 -10.002,-20.019 -9.402,-20.019 -16.002,-19.419 -15.402,-19.419 -14.802,-19.419 -14.202,-19.419 -13.602,-19.419 -13.002,-19.419 -12.402,-19.419 -11.802,-19.419 -11.202,-19.419 -10.602,-19.419 -10.002,-19.419 -9.402,-19.419 -16.002,-18.819 -15.402,-18.819 -14.802,-18.819 -14.202,-18.819 -13.602,-18.819 -13.002,-18.819 -12.402,-18.819 -11.802,-18.819 -11.202,-18.819 -10.602,-18.819 -10.002,-18.819 -9.402,-18.819 -16.002,-18.219 -15.402,-18.219 -14.802,-18.219 -14.202,-18.219 -13.602,-18.219 -13.002,-18.219 -12.402,-18.219 -11.802,-18.219 -11.202,-18.219 -10.602,-18.219 -10.002,-18.219 -9.402,-18.219 -16.002,-17.619 -15.402,-17.619 -14.802,-17.619 -14.202,-17.619 -13.602,-17.619 -13.002,-17.619 -12.402,-17.619 -11.802,-17.619 -11.202,-17.619 -10.602,-17.619 -10.002,-17.619 -9.402,-17.619 -4.291,-17.205 -16.002,-17.019 -15.402,-17.019 -14.802,-17.019 -14.202,-17.019 -13.602,-17.019 -13.002,-17.019 -12.402,-17.019 -11.802,-17.019 -11.202,-17.019 -10.602,-17.019 -10.002,-17.019 -9.402,-17.019 -16.002,-16.419 -15.402,-16.419 -14.802,-16.419 -14.202,-16.419 -13.602,-16.419 -13.002,-16.419 -12.402,-16.419 -11.802,-16.419 -11.202,-16.419 -10.602,-16.419 -10.002,-16.419 -9.402,-16.419 -16.002,-15.819 -15.402,-15.819 -14.802,-15.819 -14.202,-15.819 -13.602,-15.819 -13.002,-15.819 -12.402,-15.819 -11.802,-15.819 -11.202,-15.819 -10.602,-15.819 -10.002,-15.819 -9.402,-15.819 -15.402,-15.219 -14.802,-15.219 -14.202,-15.219 -13.602,-15.219 -13.002,-15.219 -12.402,-15.219 -11.802,-15.219 -11.202,-15.219 -10.602,-15.219 -10.002,-15.219 -9.402,-15.219
RS: 
RST: 
RX: 
SCL: pad.2@-24.727,-2.943 pad.3@0.1,-1.75 | length 30.5
  Signal Layer 2 w0.2: -24.719,-3.695 -24.719,-0.455 -24.098,0.165 -10.508,0.165 -8.904,-1.438 -4.42,-1.438 -2.477,-3.382 v2(-2.318,-3.382)
  Bottom Layer w0.5: v2(-2.318,-3.382) -0.686,-1.75 pad.3@0.1,-1.75
  other v1: -24.759,-2.516 -24.759,-1.916
  other v2: -24.759,-3.116
SCL1: 
SDA: pad.2@-26.227,-2.943 pad.3@0.1,-0.15 | length 31
  Signal Layer 2 w0.2: v1(-26.259,-1.916) -26.259,-0.464 -25.203,0.592 -10.34,0.592 -8.749,-0.999 v2(-1.749,-0.999) ; -26.219,-3.695 v1@-26.219,-1.916
  Bottom Layer w0.5: v2(-1.749,-0.999) -0.9,-0.15 pad.3@0.1,-0.15
  other v1: -26.259,-2.516
  other v2: -26.259,-3.116
SDA1: 
SET: 
SGND: 1.2 2.2 3.2 4.2 5.2 6.2 CY1.1 CY2.2 pad.0@-18.427,-2.943 pad.3@0,0 R18.1 U3.3
  other v1: -31.128,-5.664 -31.128,-5.064 -12.534,-3.567 -11.934,-3.567 -11.334,-3.567 -18.752,-3.412 -18.152,-3.412 -12.534,-2.967 -11.934,-2.967 -11.334,-2.967 -18.752,-2.812 -18.152,-2.812 -18.752,-2.212 -18.152,-2.212 -2.369,0.591 -2.369,1.191 -13.013,1.236 -12.413,1.236 -11.813,1.236 -2.369,1.791 -13.013,1.836 -12.413,1.836 -11.813,1.836 -2.369,2.391 -13.013,2.436 -12.413,2.436 -11.813,2.436 -6.22,2.541 -5.62,2.541 -2.369,2.991 -6.22,3.141 -5.62,3.141
SRCG_A: 
SW: C31.1 D2.1 LB1.2 T1.3
SW-SR: 
SWCLK: pad.2@-23.227,-2.943 pad.3@0.1,-3.35 | length 28.6
  Signal Layer 2 w0.2: -23.219,-3.695 -23.219,-0.524 -22.943,-0.249 -10.673,-0.249 -9.043,-1.879 -4.625,-1.879 -2.346,-4.158 v2(-1.912,-4.158)
  Bottom Layer w0.5: v2(-1.912,-4.158) -1.104,-3.35 pad.3@0.1,-3.35
  other v1: -23.259,-2.516 -23.259,-1.916
  other v2: -23.259,-3.116
SWCLK1: 
SWCLK2: 
SWDIO: pad.2@-21.727,-2.943 pad.3@0.1,-4.95 | length 27.2
  Signal Layer 2 w0.2: -21.719,-3.695 -21.719,-0.803 -21.583,-0.667 -10.849,-0.667 -9.159,-2.358 -4.779,-2.358 -2.31,-4.827 v2(-2.31,-5.384)
  Bottom Layer w0.5: v2(-2.31,-5.384) -1.876,-4.95 pad.3@0.1,-4.95
  other v1: -21.759,-3.116 -21.759,-2.516 -21.759,-1.916
SWDIO1: 
SWDIO2: 
SWRST: 
TX: 
TXD: 
U2-2: 
V3V3: 
VBUS: 
VC: 
VDD: 
VDD1: 
VDS: 
VFB: 
VFB1: 
VIN: C13.2 pad.1 pad.3@0,-2.1 R15.1 R17.1
  other v1: -16.695,-3.428 -16.095,-3.428 -15.495,-3.428 -16.695,-2.828 -16.095,-2.828 -15.495,-2.828 -16.695,-2.228 -16.095,-2.228 -15.495,-2.228
  other v2: -2.631,-2.153 -2.083,-1.892 -3.061,-1.741 -2.522,-1.597
VIN_3V: 
VMS: R21.1 R50.1 U6.7 | length 3.7
  Bottom Layer w0.4: U6.7@-7.76,-18.45 -5.885,-18.45 R21.1@-5.885,-17.876 R50.1@-5.885,-19.166
VOUT1: pad.0@-1.55,-5.55 pad.2@-20.227,-2.943 pad.3@0,-4.05 | length 19.7
  Top Layer w0.2: pad.3@-0.469,-4.519 pad.3@0,-4.05 pad.3@-0.174,-3.876
  Signal Layer 2 w0.254: v1(-20.259,-1.916) -20.259,-1.604 -19.785,-1.13 -11.064,-1.13 -7.15,-5.044 v2(-3.6,-5.044)
  other v1: -20.259,-3.116 -20.259,-2.516
  other v2: -3.041,-5.044
VXO: 
XGND: 
pads on no net: T1.1 T1.2 T1.7 T1.8

## Polygon pours and split planes (outlines as drawn)
HV on Bottom Layer "Bottom Layer-No Net" (solid, remove dead copper, pour order 125): -21.163,-26.538 -27.15,-26.538 -28.063,-27.451 -28.063,-29.114 -27.474,-29.704 -24.804,-29.704 -21.756,-32.751 -21.756,-36.911 -21.387,-37.28 -17.396,-37.28 -17.203,-37.087 -17.203,-32.844 -15.123,-30.764 -15.123,-29.296 -15.387,-29.031 -16.641,-29.031 -17.875,-30.265 -19.977,-30.265 -20.866,-29.376 -20.866,-26.834
PGND on Bottom Layer "Bottom Layer-No Net" (solid, remove dead copper, pour order 112): -38.766,-29.072 -35.857,-29.072 -35.236,-29.694 -35.236,-31.275 -34.983,-31.527 -32.588,-31.527 -32.287,-31.227 -32.287,-27.811 -32.737,-27.361 -38.727,-27.361 -38.768,-27.402
PGND on Bottom Layer "Bottom Layer-No Net" (solid, remove dead copper, pour order 132): -24.787,-15.895 -24.787,-29.72 -21.756,-32.751 -21.756,-34.568 -22.174,-34.986 -24.612,-34.986 -27.695,-31.903 -29.601,-31.903 -31.508,-29.996 -31.508,-26.918 -28.554,-23.964 -28.554,-17.455 -26.931,-15.832 -24.936,-15.832
PGND on Bottom Layer "Bottom Layer-No Net" (solid, remove dead copper, pour order 107): -4.725,-25.612 -3.302,-25.612 -2.904,-25.213 -2.904,-16.435 -2.18,-15.711 -2.658,-15.233 -3.373,-15.233 -4.218,-15.233 -4.662,-15.677 -4.696,-15.711 -4.957,-15.971 -4.957,-24.904 -4.957,-25.206 -4.957,-25.496 -4.841,-25.612
PGND on Bottom Layer "Bottom Layer-No Net" (solid, remove dead copper, pour order 108): -23.22,-21.212 -23.22,-17.886 -21.841,-16.507 -20.106,-14.772 -18.6,-14.772 -7.341,-14.772 -6.962,-15.152 -6.962,-16.237 -7.121,-16.396 -8.611,-16.396 -8.896,-16.681 -8.896,-24.631 -8.896,-25.175 -9.128,-25.407 -9.622,-25.902 -10.355,-25.902 -18.292,-25.902 -19.638,-24.556 -21.319,-22.875 -22.396,-22.875 -23.203,-22.068 -23.203,-21.283
SGND on Bottom Layer "Bottom Layer-No Net" (solid, remove dead copper, pour order 111): -2.429,0.302 -2.147,0.302 -1.952,0.497 -1.952,1.018 -1.952,3.391 -2.117,3.557 -7.465,3.557 -7.66,3.362 -7.66,1.953 -7.564,1.857 -6.533,1.857 -6.327,2.063 -6.278,2.112 -5.423,2.112 -3.858,2.112 -3.14,1.395 -2.659,0.913 -2.659,0.7 -2.659,0.447 -2.534,0.322
SGND on Bottom Layer "Bottom Layer-No Net" (solid, remove dead copper, pour order 88): -18.383,2.742 -26.743,2.742 -27.075,2.41 -27.355,2.13 -27.355,1.837 -27.355,-0.945 -27.245,-1.055 -19.564,-1.055 -19.188,-1.43 -18.814,-1.805 -18.431,-1.805 -17.791,-1.165 -17.791,1.192 -17.791,2.15 -18.383,2.742
PGND on Top Layer "Bottom Layer-No Net" (solid, remove dead copper, pour order 117): -28.658,-21.264 -27.462,-22.46 -27.462,-23.265 -27.462,-27.411 -28.208,-28.156 -29.114,-28.156 -29.954,-28.996 -29.954,-32.41 -28.51,-33.853 -26.432,-33.853 -25.62,-34.665 -24.692,-35.593 -24.006,-35.593 -23.792,-35.593 -23.207,-35.008 -23.207,-29.21 -23.207,-28.527 -24.099,-27.635 -24.432,-27.302 -24.432,-25.908 -24.432,-24.731 -24.432,-19.021 -25.412,-18.041 -25.507,-17.946 -27.484,-17.946 -28.719,-19.181 -28.719,-20.702
PGND on Top Layer "Bottom Layer-No Net" (solid, remove dead copper, pour order 121): -19.51,-14.176 -19.51,-16.828 -19.801,-17.119 -21.347,-17.119 -22.905,-18.676 -25.867,-21.638 -26.115,-21.638 -26.115,-17.071 -25.985,-16.942 -22.044,-13 -20.757,-13 -19.818,-13 -19.51,-13.308 -19.51,-13.922
PGND on Top Layer "Bottom Layer-No Net" (solid, remove dead copper, pour order 123): -27.462,-22.46 -27.462,-22.502 -29.355,-24.395 -31.782,-26.822 -31.782,-27.658 -31.782,-30.581 -31.782,-32.806 -31.277,-33.311 -30.736,-33.853 -28.51,-33.853 -26.432,-33.853 -24.692,-35.593 -24.106,-35.008 -23.207,-35.008 -23.207,-28.527 -24.432,-27.302 -24.432,-26.948 -24.432,-20.062
PGND on Top Layer "Bottom Layer-No Net" (solid, remove dead copper, pour order 128): -24.692,-35.593 -22.819,-37.465 -4.184,-37.465 -3.831,-37.112 -3.831,-13.144 -3.959,-13.015 -15.098,-13.015 -18.225,-13.015 -18.939,-13.73 -19.047,-13.838 -19.047,-14.025 -19.047,-17.024 -19.047,-17.098 -19.408,-17.459 -19.46,-17.511 -20.243,-17.511 -21.227,-17.511 -21.796,-18.08 -24.052,-20.336 -24.052,-20.827 -24.052,-26.915 -22.651,-28.316 -22.651,-29.85 -22.938,-30.138 -25.297,-32.497 -25.297,-34.184 -25.297,-34.988 -24.692,-35.593
PGND on Top Layer "Bottom Layer-No Net" (solid, remove dead copper, pour order 113): -32.435,-28.325 -32.435,-27.094 -23.413,-18.072 -23.406,-18.072 -19.51,-14.176 -19.51,-13.308 -20.441,-12.377 -26.8,-12.377 -31.209,-16.786 -31.209,-21.495 -35.117,-25.404 -35.117,-29.055 -34.799,-29.373 -32.752,-29.373 -32.436,-29.057
VIN on Top Layer "Bottom Layer-No Net" (solid, remove dead copper, pour order 81): 0.846,-2.847 -0.958,-2.847 -3.075,-4.964 -13.516,-4.964 -14.76,-3.719 -16.852,-3.719 -17.005,-3.566 -17.005,-2.116 -15.562,-0.672 -2.765,-0.672 -1.93,-1.508 -1.403,-1.508 -1.242,-1.347 0.902,-1.347 0.902,-2.85 0.848,-2.85
SGND on Top Layer "Bottom Layer-No Net" (solid, remove dead copper, pour order 84): 0.788,0.768 -1.118,0.768 -1.55,1.2 -1.55,3.105 -1.881,3.436 -2.002,3.557 -2.117,3.557 -17.749,3.557 -19.188,2.118 -19.188,-3.734 -17.678,-3.734 -17.678,-1.43 -16.65,-0.402 -2.626,-0.402 -2.373,-0.654 -2.284,-0.744 0.84,-0.744 0.84,0.768 0.788,0.768
SGND on Top Layer "Bottom Layer-No Net" (solid, remove dead copper, pour order 92): -17.749,3.557 -29.073,3.557 -31.619,1.012 -31.619,-0.628 -31.207,-1.04 -20.007,-1.04 -19.113,-1.934 -18.835,-2.212 -18.152,-2.212 -18.152,1.373 -17.597,1.928 -17.096,2.428 -17.096,2.938 -17.096,3.384 -17.269,3.557 -17.27,3.557 -17.749,3.557
NetBD1_3 on Signal Layer 1 "Bottom Layer-No Net" (solid, remove dead copper, pour order 120): -23.899,-12.537 -25.782,-12.537 -26.344,-13.098 -26.344,-22.947 -24.221,-25.069 -23.813,-25.478 -23.737,-25.554 -21.481,-25.554 -21.194,-25.554 -20.848,-25.207 -20.848,-23.416 -21.583,-22.681 -23.117,-21.147 -23.117,-20.73 -23.117,-13.205 -23.705,-12.617
PGND on Signal Layer 1 "Bottom Layer-No Net" (solid, remove dead copper, pour order 127): -24.692,-35.593 -22.819,-37.465 -4.184,-37.465 -3.831,-37.112 -3.831,-13.144 -3.959,-13.015 -15.098,-13.015 -18.225,-13.015 -18.939,-13.73 -19.047,-13.838 -19.047,-14.025 -19.047,-17.024 -19.047,-17.098 -19.408,-17.459 -19.46,-17.511 -20.243,-17.511 -21.227,-17.511 -21.796,-18.08 -24.052,-20.336 -24.052,-20.827 -24.052,-26.915 -22.651,-28.316 -22.651,-29.85 -22.938,-30.138 -25.297,-32.497 -25.297,-34.184 -25.297,-34.988 -24.692,-35.593
PGND on Signal Layer 1 "Bottom Layer-No Net" (solid, remove dead copper, pour order 129): -28.583,-18.814 -28.583,-19.637 -30.241,-21.295 -31.782,-22.836 -32.099,-23.153 -32.099,-27.409 -32.099,-32.49 -30.736,-33.853 -26.432,-33.853 -22.819,-37.465 -22.819,-30.834 -22.394,-30.408 -22.433,-30.37 -22.433,-29.075 -22.433,-26.858 -26.344,-22.947 -25.996,-22.598 -25.996,-19.42 -25.996,-18.765 -26.454,-18.307 -28.076,-18.307 -28.583,-18.814
SGND on Signal Layer 1 "Bottom Layer-No Net" (solid, remove dead copper, pour order 83): -12.643,-3.883 -11.236,-3.883 -9.262,-1.909 -4.112,-1.909 -2.924,-0.721 0.788,-0.721 0.788,0.768 -1.881,3.436 -17.87,3.436 -19.188,2.118 -19.188,-3.734 -17.678,-3.734 -17.678,-1.43 -16.65,-0.402 -4.601,-0.402 -4.285,-0.718 -10.684,-0.718 -12.852,-2.886 -12.852,-3.675
VIN on Signal Layer 1 "Bottom Layer-No Net" (solid, remove dead copper, pour order 86): -17.005,-3.566 -16.852,-3.719 -14.979,-3.719 -14.76,-3.719 -13.516,-4.964 -3.075,-4.964 -2.332,-4.221 -0.962,-2.851 0.844,-2.851 0.844,-1.404 0.788,-1.347 -2.091,-1.347 -2.724,-0.714 -15.603,-0.714 -17.005,-2.116 -17.005,-3.566
SGND on Signal Layer 1 "Bottom Layer-No Net" (solid, remove dead copper, pour order 90): -17.87,3.436 -29.184,3.436 -31.659,0.961 -31.659,-1.04 -31.205,-1.494 -19.47,-1.494 -18.752,-2.212 -16.549,-0.01 -16.549,2.847 -16.549,3.231 -16.662,3.344 -16.754,3.436 -17.87,3.436
PGND on Signal Layer 2 "Bottom Layer-No Net" (solid, remove dead copper, pour order 126): -22.819,-37.465 -4.184,-37.465 -3.831,-37.112 -3.831,-13.144 -3.959,-13.015 -18.225,-13.015 -24.052,-18.842 -24.052,-26.915 -22.651,-28.316 -22.651,-29.85 -25.297,-32.497 -25.297,-34.988
NetBD1_3 on Signal Layer 2 "Bottom Layer-No Net" (solid, remove dead copper, pour order 118): -23.899,-12.537 -25.782,-12.537 -26.344,-13.098 -26.344,-22.947 -24.221,-25.069 -23.813,-25.478 -23.737,-25.554 -21.481,-25.554 -21.194,-25.554 -20.848,-25.207 -20.848,-23.416 -21.583,-22.681 -23.117,-21.147 -23.117,-20.73 -23.117,-13.205 -23.705,-12.617
PGND on Signal Layer 2 "Bottom Layer-No Net" (solid, remove dead copper, pour order 130): -22.529,-34.494 -22.529,-26.762 -26.344,-22.947 -26.344,-20.228 -26.067,-19.952 -26.067,-18.724 -26.115,-18.676 -26.657,-18.134 -27.355,-18.134 -27.825,-18.134 -28.576,-18.885 -28.624,-18.885 -31.209,-21.47 -32.099,-22.36 -32.099,-23.153 -32.099,-32.49 -30.736,-33.853 -26.432,-33.853 -25.492,-34.792
SGND on Signal Layer 2 "Bottom Layer-No Net" (solid, remove dead copper, pour order 122): 0.788,0.768 -1.701,0.768 -2.699,1.765 -6.405,1.765 -7.734,3.094 -29.536,3.094 -31.659,0.972 -31.659,-5.71 -30.916,-6.453 -29.749,-6.453 -29.285,-5.989 -29.285,-0.671 -27.653,0.961 -10.211,0.961 -8.499,-0.751 0.758,-0.751 0.788,-0.721

## Keep-outs
Keep-Out Layer:
  lines w0.1: -31.26,3.719 -1.551,3.719 -1.55,2.419 -1.55,3.719 ; -31.25,-38.283 -1.54,-38.283 -1.541,-36.983 ; -1.55,-28.531 ccw(c-1.55,-28.781) -1.3,-28.781 0.95,-28.781 0.95,-33.781 -1.3,-33.781 ccw(c-1.55,-33.781) -1.55,-34.031 -1.55,-38.283 -31.26,-38.283 -31.259,-36.983 -41.259,-36.98 -41.25,-23.081 -33.25,-23.081 -33.25,2.419 -31.25,2.419 -31.25,3.719 ; -1.55,-5.9 cw(c-1.55,-5.65) -1.3,-5.65 0.95,-5.65 0.95,0.95 -1.3,0.95 cw(c-1.55,0.95) -1.55,1.2 -1.55,3.719 ; -1.526,-28.531 -1.526,-5.906 ; -31.25,3.719 -1.55,3.719 ; -31.25,3.719 -1.55,3.719 ; -39.85,-34.331 ccw(c-39.85,-34.581) -39.6,-34.581 -39,-34.581 ccw(c-38.75,-34.581) -38.75,-34.331 -38.75,-33.431 ccw(c-38.75,-33.181) -39,-33.181 -39.6,-33.181 ccw(c-39.85,-33.181) -39.85,-33.431 -39.85,-34.331 ; -39.85,-31.731 ccw(c-39.85,-31.981) -39.6,-31.981 -39,-31.981 ccw(c-38.75,-31.981) -38.75,-31.731 -38.75,-30.831 ccw(c-38.75,-30.581) -39,-30.581 -39.6,-30.581 ccw(c-39.85,-30.581) -39.85,-30.831 -39.85,-31.731 ; -39.85,-29.031 ccw(c-39.85,-29.281) -39.6,-29.281 -39,-29.281 ccw(c-38.75,-29.281) -38.75,-29.031 -38.75,-24.231 ccw(c-38.75,-23.981) -39,-23.981 -39.6,-23.981 ccw(c-39.85,-23.981) -39.85,-24.231 -39.85,-29.031 ; -29.254,-8.346 -29.254,-7.346 -14.654,-7.346 -14.654,-8.346 -29.254,-8.346 ; -28.477,-4.905 ccw(c-28.477,-5.155) -28.227,-5.155 -15.527,-5.155 ccw(c-15.277,-5.155) -15.277,-4.905 -15.277,-4.243 ccw(c-15.277,-3.993) -15.527,-3.993 -28.227,-3.993 ccw(c-28.477,-3.993) -28.477,-4.243 -28.477,-4.905

## Other copper
Top Layer:
  region net NetBD1_1: -36.892,-30.762 -32.223,-35.43 -27.332,-35.43 -26.472,-36.29 -26.472,-37.358 -26.648,-37.534 -30.16,-37.534 -31.234,-36.459 -32.232,-36.459 -36.913,-31.778 -38.721,-31.778 -38.721,-30.762
  region net SWDIO: -21.887,-1.641 -21.599,-1.641 -21.436,-1.805 -21.436,-3.259 -21.579,-3.403 -21.934,-3.403 -22.043,-3.294 -22.043,-1.797
  region net SWCLK: -23.387,-1.641 -23.099,-1.641 -22.936,-1.805 -22.936,-3.259 -23.079,-3.403 -23.434,-3.403 -23.543,-3.294 -23.543,-1.797
  region net NewNet33: -27.887,-1.641 -27.599,-1.641 -27.436,-1.805 -27.436,-3.259 -27.579,-3.403 -27.934,-3.403 -28.043,-3.294 -28.043,-1.797
  pour cut-out: -6.072,-27.724 -6.072,-30.71 -5.472,-31.311 -3.962,-31.311 -3.485,-30.833 -3.485,-28.582 -4.342,-27.724
  region net SGND: -12.67,-2.704 -11.238,-2.704 -11.063,-2.879 -11.063,-3.711 -11.236,-3.883 -12.643,-3.883 -12.852,-3.675 -12.852,-2.886
  region net SGND: -31.301,-4.726 -29.596,-4.726 -29.285,-5.037 -29.285,-5.989 -29.749,-6.453 -30.916,-6.453 -31.659,-5.71 -31.659,-4.953 -31.492,-4.786
  region net PGND: -38.615,-29.072 -35.1,-29.072 -34.799,-29.373 -34.799,-27.412 -35.117,-27.094 -35.384,-27.361 -38.615,-27.361
  region net NetBD1_3: -38.718,-25.876 -36.789,-25.876 -36.562,-25.649 -36.562,-24.498 -36.799,-24.261 -38.718,-24.261
  region net VOUT1: -3.736,-4.644 -1.475,-4.644 -1.157,-4.326 -1.157,-3.698 -0.903,-3.444 0.9,-3.444 0.905,-3.449 0.905,-4.644 0.908,-4.647 0.908,-5.088 0.723,-5.273 -1.716,-5.273 -2.065,-4.924 -2.572,-4.924 -2.975,-5.326 -3.733,-5.326 -3.852,-5.208 -3.852,-4.76
  region net VOUT1: -20.387,-1.641 -20.099,-1.641 -19.936,-1.805 -19.936,-3.259 -20.079,-3.403 -20.434,-3.403 -20.543,-3.294 -20.543,-1.797
  region net SDA: -26.387,-1.641 -26.099,-1.641 -25.936,-1.805 -25.936,-3.259 -26.079,-3.403 -26.434,-3.403 -26.543,-3.294 -26.543,-1.797
  region net SCL: -24.887,-1.641 -24.599,-1.641 -24.436,-1.805 -24.436,-3.259 -24.579,-3.403 -24.934,-3.403 -25.043,-3.294 -25.043,-1.797
  pour cut-out: -18.823,-25.703 ccw(c-21.363,-25.703) -21.363,-23.163 -21.885,-23.163 ccw(c-21.885,-25.703) -24.425,-25.703 -24.425,-26.219 ccw(c-21.885,-26.219) -21.885,-28.759 -21.363,-28.759 ccw(c-21.363,-26.219) -18.823,-26.219
  pour cut-out: -2.853,-24.068 ccw(c-4.855,-24.068) -4.855,-22.066 -4.856,-22.066 ccw(c-4.856,-24.059) -6.849,-24.059 ccw(c-4.84,-24.059) -4.84,-26.068 ccw(c-4.84,-24.08) -2.853,-24.08
  pour cut-out: -13.853,-30.068 -13.853,-27.068 -18.464,-27.068 -18.464,-30.061 ccw(c-16.156,-30.061) -16.156,-32.369 -16.153,-32.369 ccw(c-16.153,-30.068)
Signal Layer 1:
  pour cut-out: -25.203,-20.035 -25.881,-21.868 -26.344,-22.331 -26.344,-22.947 -26.448,-22.843 -26.448,-22.23 -26.059,-21.842 -25.33,-20.037
  pour cut-out: -26.32,-25.873 -25.618,-25.17 -25.133,-25.17 -25.133,-25.463 -25.995,-26.325
Signal Layer 2:
  region net SWDIO: -21.438,-1.205 -20.957,-0.724 -21.112,-0.569 -21.593,-1.05
  rectangle net SGND: -19.113,-3.716 -17.774,-1.934
  rectangle net VIN: -16.992,-3.719 -14.979,-1.935
  pour cut-out: -25.203,-20.035 -25.881,-21.868 -26.344,-22.331 -26.344,-22.947 -26.448,-22.843 -26.448,-22.23 -26.059,-21.842 -25.33,-20.037
  region net SWDIO: -22.179,-3.945 -22.179,-1.119 -21.729,-0.67 -21.275,-0.67 -21.275,-3.945
  region net SWCLK: -23.679,-3.945 -23.679,-1.119 -23.287,-0.727 -23.184,-0.727 -22.775,-1.136 -22.775,-3.945
  region net PGND: -5.349,-26.061 -3.248,-26.061 -2.605,-26.703 -2.605,-36.792 -3.286,-37.472 -5.245,-37.472 -5.36,-37.358 -5.36,-35.912 -4.311,-34.863 -4.311,-31.66 -3.485,-30.833 -3.485,-28.582 -3.938,-28.129 -5.301,-28.129 -5.788,-27.642 -5.788,-26.499
  region net PGND: -22.819,-37.465 -25.492,-34.792 -25.492,-32.887 -25.052,-32.447 -23.566,-32.447 -23.207,-32.806 -23.207,-34.637 -21.768,-36.075 -5.523,-36.075 -4.73,-35.282 -4.148,-35.282 -3.926,-35.504 -3.926,-36.868 -4.523,-37.465
  pour cut-out: -6.041,-26.382 -5.484,-25.825 -3.153,-25.825 -2.363,-26.615 -2.363,-36.982 -3.106,-37.725 -22.994,-37.725 -25.492,-35.226 -25.492,-34.792 -23.334,-34.792 -23.207,-34.665 -22.699,-34.665 -21.621,-35.743 -5.615,-35.743 -4.585,-34.714 -4.585,-31.555 -3.724,-30.694 -3.724,-28.715 -4.053,-28.386 -5.409,-28.386 -6.041,-27.755
  pour cut-out: -26.32,-25.873 -25.618,-25.17 -25.133,-25.17 -25.133,-25.463 -25.995,-26.325
  region net SGND: -6.5,3.436 -2.302,3.436 -1.952,3.086 -1.952,0.887 -2.103,0.735 -2.912,0.735 -3.442,1.265 -3.442,1.73 -3.793,2.081 -6.318,2.081 -6.69,2.452 -6.69,3.247
  region net VIN: -3.142,-1.326 -2.206,-1.326 -1.842,-1.69 -1.842,-2.06 -2.24,-2.458 -2.79,-2.458 -3.305,-1.942 -3.305,-1.489
  region net VOUT1: -20.63,-3.207 -20.63,-1.389 -20.242,-1.001 -11.001,-1.001 -7.326,-4.675 -3.003,-4.675 -2.773,-4.905 -2.773,-4.906 -2.773,-5.125 -2.975,-5.326 -7.625,-5.326 -11.282,-1.67 -19.674,-1.67 -19.798,-1.793 -19.798,-3.121 -20.079,-3.403 -20.434,-3.403
  region net SGND: -2.302,3.436 -8.144,3.436 -8.815,2.766 -6.725,0.676 -3.106,0.676 -2.764,1.018
  region net SDA: -26.679,-3.945 -26.679,-1.119 -26.287,-0.727 -26.184,-0.727 -25.775,-1.136 -25.775,-3.945
  region net SCL: -25.179,-3.945 -25.179,-1.119 -24.787,-0.727 -24.684,-0.727 -24.275,-1.136 -24.275,-3.945